# Altium PCB A313_5.PcbDoc (part 4 of 4)
Units mm, origin at the board's own origin, x right, y up, seen from the top; angles counter-clockwise.
Board outline 230.01 x 157.01 mm, 2 copper layers (Top Layer, Bottom Layer); 173 components, 153 nets, 1229 pads, 884 vias.
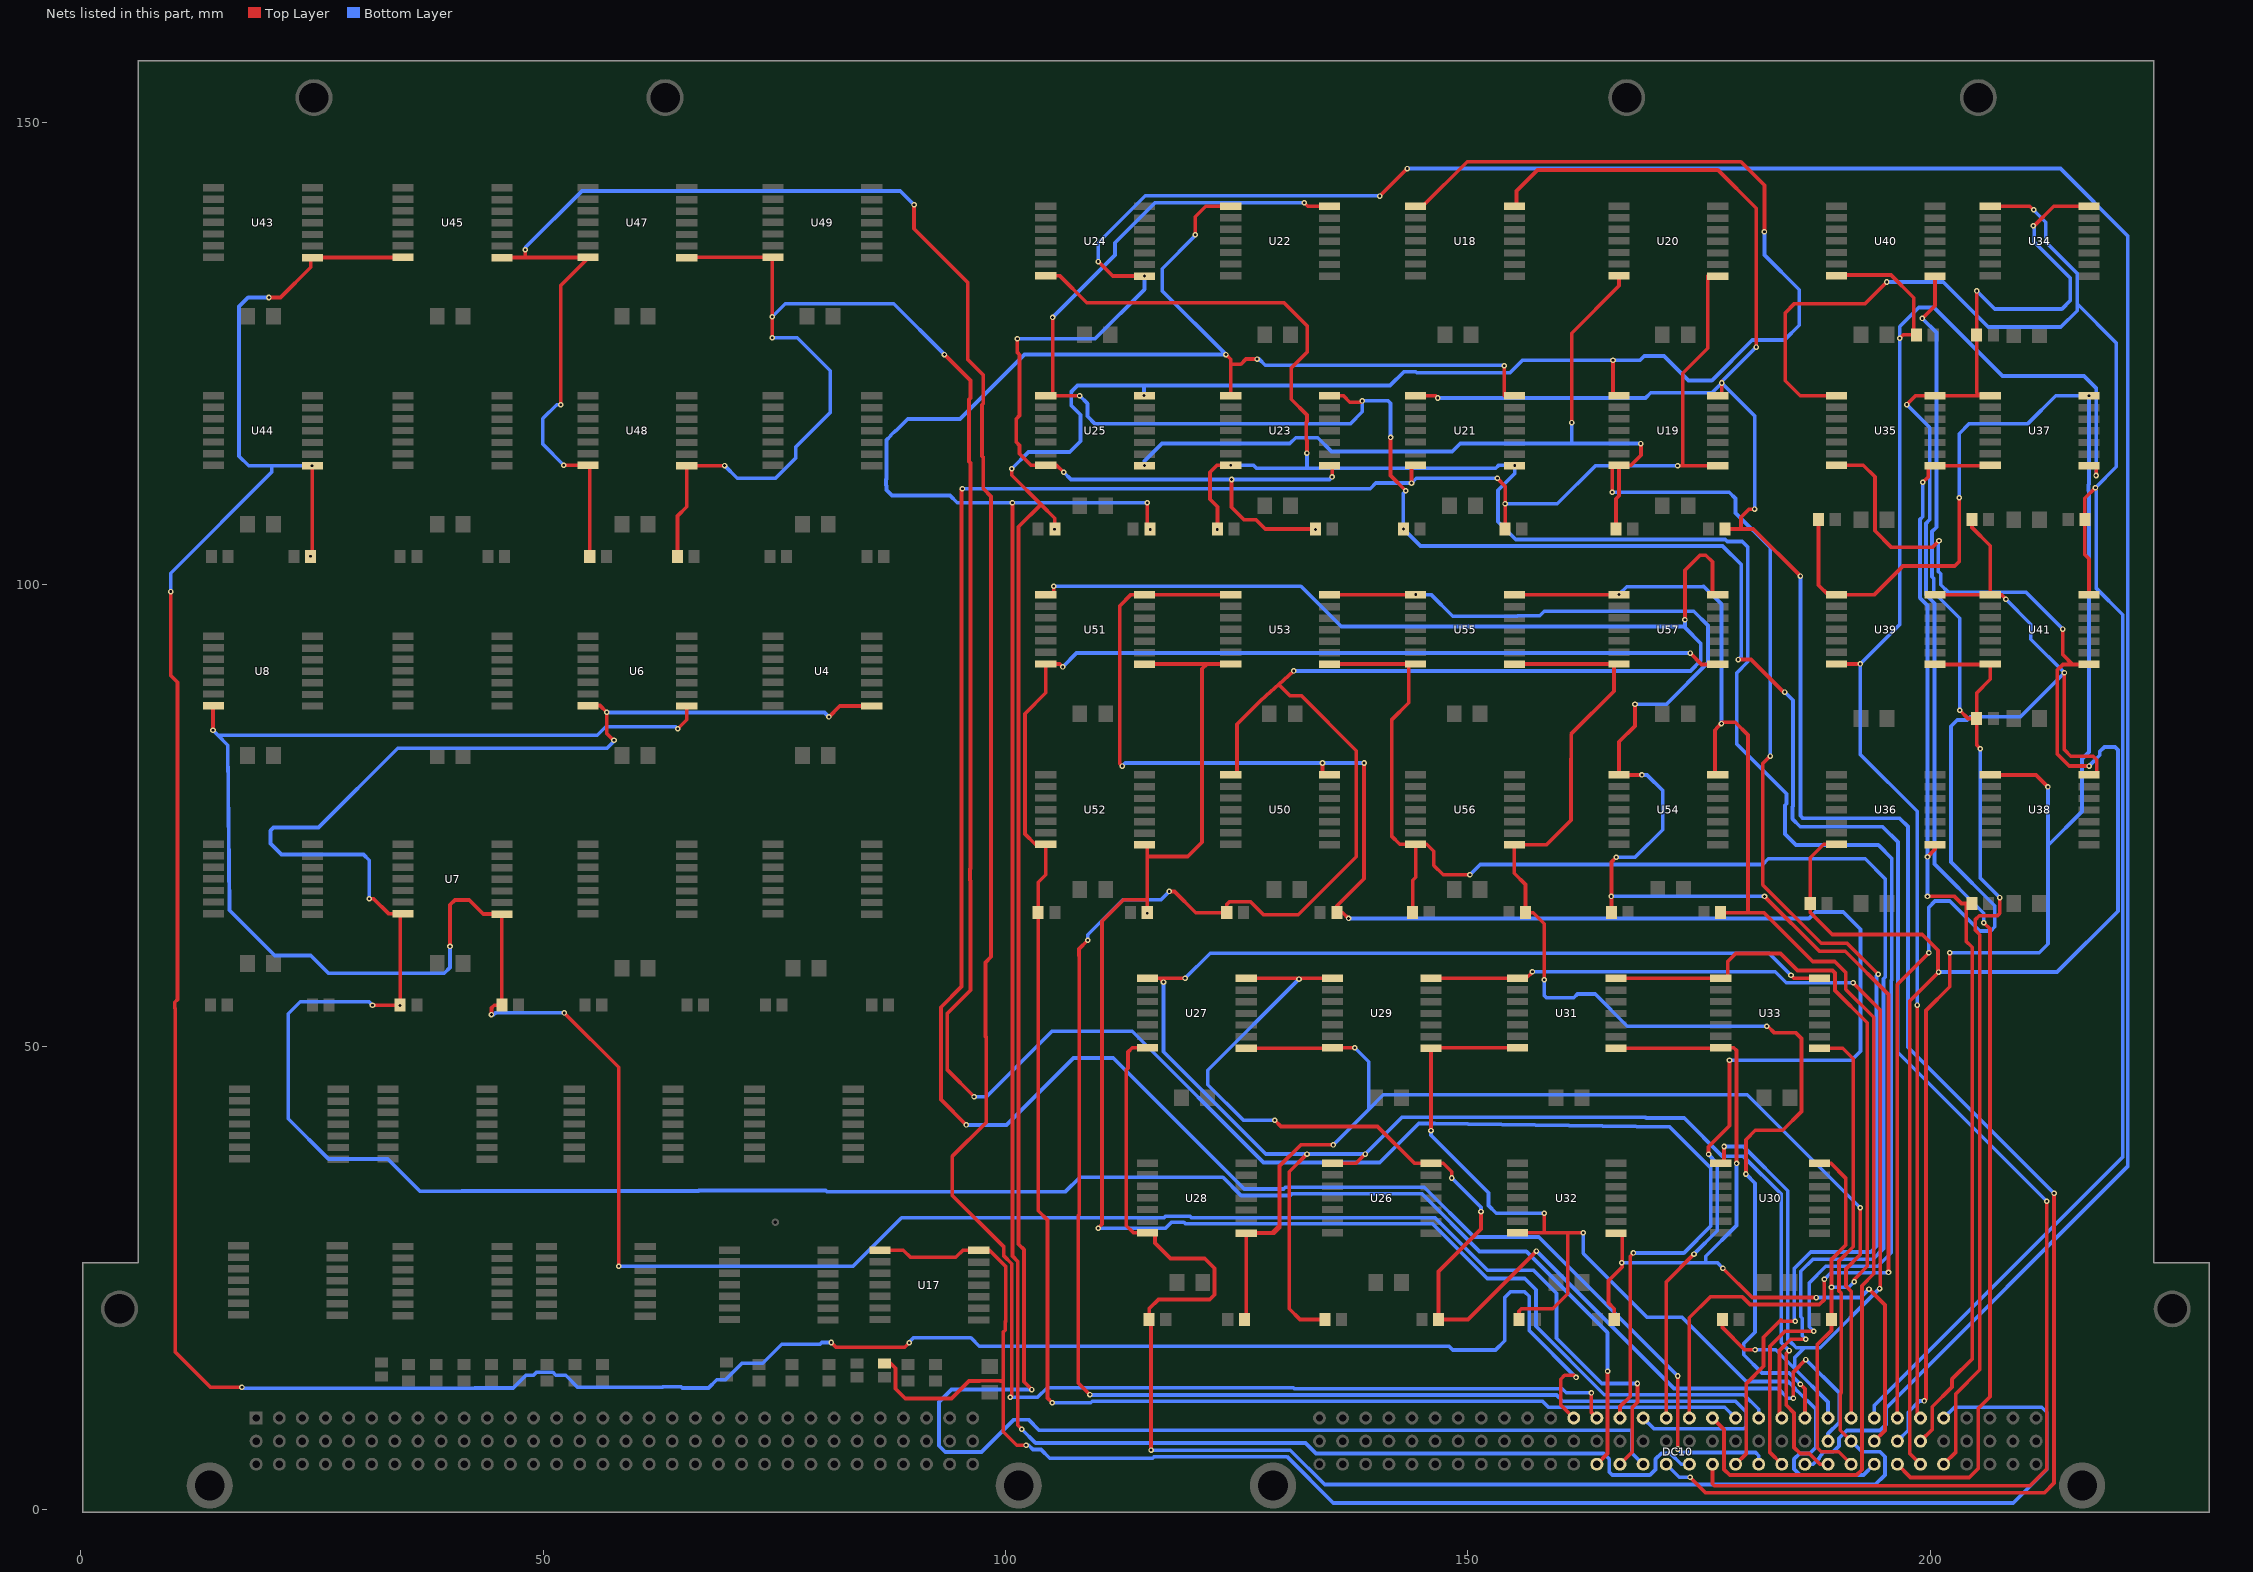
[diagram p4: the nets of this part, all layers, seen from the top]

## Via types
v1: diameter 0.6, hole 0.3, Top Layer to Bottom Layer, 884 vias

## Nets (pads, with @x,y where several pads share a name; then routed paths per layer and width w, separated by ;. In a path a pad name is that pad's centre, name@x,y a point inside that pad or via, vN(x,y) a via of type N, cw(c..) or ccw(c..) an arc to the next point about the centre after c; other vN are vias at no path point) (continued)
vih.6b=: DC10.C12 R45.1 U43.8 U44.8 U45.7 | length 331.8
  Top Layer w0.4: v1(9.712,99.232) 9.712,90.138 10.44,89.41 10.44,55.103 10.152,54.815 10.152,54.19 10.206,54.136 10.206,16.979 14.008,13.176 v1(17.408,13.176) ; v1(20.329,131.032) 21.582,131.032 24.85,134.3 24.85,135.35 34.8,135.35 U45.7@34.85,135.4 ; R45.1@24.825,103 25.025,103.2 U44.8@25.025,112.85 v1(25,112.825) ; v1(81.137,18.013) 81.658,17.493 89.091,17.493 v1(89.575,17.977) ; DC10.C12@161.45,9.85 160.037,11.263 160.037,14.04 160.461,14.464 161.485,14.464 v1(161.705,14.243)
  Bottom Layer w0.4: v1(9.712,99.232) 9.712,101.212 20.646,112.146 20.646,112.804 20.625,112.825 ; v1(17.408,13.176) 17.513,13.071 42.569,13.071 42.602,13.104 46.752,13.104 48.124,14.476 48.935,14.476 49.256,14.797 51.041,14.797 51.362,14.476 52.422,14.476 53.736,13.162 62.861,13.162 62.932,13.233 64.895,13.233 65.042,13.086 65.084,13.086 65.102,13.104 67.879,13.104 68.756,13.981 69.706,13.981 71.491,15.766 73.74,15.766 75.789,17.815 79.942,17.815 80.14,18.013 v1(81.137,18.013) ; v1(20.329,131.032) 18.082,131.032 17.1,130.05 17.1,113.865 18.14,112.825 20.625,112.825 ; v1(25,112.825) 20.625,112.825 ; v1(89.575,17.977) 89.575,18.056 90.047,18.528 96.247,18.528 97.154,17.621 147.946,17.621 148.352,17.215 152.993,17.215 153.975,18.197 153.975,22.875 154.614,23.514 156.121,23.514 156.626,23.009 156.626,19.322 v1(161.705,14.243)
  other v1: 24.822,103.05
vih.7a=: DC10.A13 R7.1 U4.8 U6.7 U7.7 | length 300.3
  Top Layer w0.4: v1(31.175,66.008) 31.649,66.008 33.258,64.4 U7.7@34.85,64.4 34.525,64.075 R7.1@34.525,54.5 v1(31.533,54.5) ; U6.7@54.848,86.9 56.143,86.9 v1(56.867,86.176) 56.867,83.877 57.594,83.15 v1(57.65,83.15) ; v1(80.891,85.668) 82.073,86.85 U4.8@85.525,86.85 ; DC10.A13@163.95,4.85 165.109,6.009 v1(165.109,14.897)
  Bottom Layer w0.4: v1(31.175,66.008) 31.175,70.174 30.565,70.784 21.701,70.784 20.507,71.977 20.507,73.374 20.837,73.705 25.688,73.705 34.276,82.292 56.9,82.292 57.65,83.042 v1(57.65,83.15) ; v1(31.533,54.5) 31.169,54.864 23.713,54.864 22.429,53.58 22.429,42.225 26.789,37.865 33.181,37.865 36.661,34.385 41.158,34.385 41.172,34.4 66.8,34.4 66.854,34.454 80.533,34.454 80.652,34.335 106.486,34.335 108.035,35.884 123.504,35.884 125.474,33.914 130.792,33.914 130.995,34.117 144.998,34.117 151.248,27.866 156.326,27.866 165.109,19.084 v1(165.109,14.897) ; v1(56.867,86.176) 56.897,86.146 80.413,86.146 v1(80.891,85.668)
  other v1: 34.5,54.475
vih.7b=: DC10.C13 R47.1 U45.8 U47.7 U48.7 | length 297.7
  Top Layer w0.4: U45.8@45.525,135.35 47.925,135.35 ; v1(48.05,136.2) 48.05,135.475 47.925,135.35 ; v1(51.901,119.445) 51.901,132.325 54.85,135.274 U47.7@54.85,135.4 54.8,135.35 47.925,135.35 ; v1(52.228,112.9) U48.7@54.85,112.9 55.025,112.9 R47.1@55.025,103 ; v1(90.103,141.065) 90.103,138.459 95.9,132.661 95.9,124.332 97.599,122.633 97.599,119.579 97.453,119.433 97.453,113.867 97.599,113.721 97.599,110.354 98.434,109.519 98.434,59.735 97.824,59.125 97.824,51.099 97.926,50.997 97.926,41.828 94.218,38.119 94.218,33.945 99.816,28.347 99.816,27.375 100.659,26.532 100.659,12.226 v1(100.517,12.084) ; v1(163.356,12.569) 163.356,10.444 DC10.C13@163.95,9.85
  Bottom Layer w0.4: v1(48.05,136.2) 48.05,136.427 54.18,142.557 81.602,142.557 81.608,142.55 88.618,142.55 v1(90.103,141.065) ; v1(51.901,119.445) 51.46,119.445 49.948,117.934 49.948,115.18 v1(52.228,112.9) ; v1(100.517,12.084) 103.463,12.084 104.511,13.132 131.128,13.132 131.234,13.026 160.173,13.026 160.631,12.569 v1(163.356,12.569)
vih.8a=: DC10.A14 R8.1 U6.8 U7.8 U8.7 | length 298
  Top Layer w0.4: v1(14.284,84.22) 14.284,86.9 U8.7@14.35,86.9 ; v1(39.912,60.852) 39.912,65.348 40.446,65.881 41.988,65.881 43.519,64.35 U7.8@45.525,64.35 R8.1@45.525,54.5 44.7,54.5 44.4,54.2 v1(44.4,53.475) ; v1(52.282,53.664) 58.175,47.771 v1(58.175,26.257) ; v1(64.536,84.384) 65.516,85.363 65.516,86.85 U6.8@65.525,86.85 ; DC10.A14@166.45,4.85 167.776,6.176 167.776,10.992 168.335,11.551 v1(168.335,13.583)
  Bottom Layer w0.4: v1(14.284,84.22) 14.812,83.692 ; v1(39.912,60.852) 39.912,58.577 39.285,57.95 26.775,57.95 24.852,59.873 20.952,59.873 16.067,64.758 15.884,82.62 14.812,83.692 ; v1(44.4,53.475) 44.651,53.475 44.84,53.664 v1(52.282,53.664) ; v1(58.175,26.257) 83.499,26.257 88.757,31.515 117.128,31.515 117.282,31.669 119.944,31.669 120.098,31.515 146.44,31.515 152.124,25.831 157.096,25.831 159.58,23.348 159.58,18.477 164.474,13.583 v1(168.335,13.583) ; v1(64.536,84.384) 64.316,84.604 56.747,84.604 55.835,83.692 14.812,83.692
vih.8b=: DC10.C14 R48.1 U47.8 U48.8 U49.7 | length 292
  Top Layer w0.4: R48.1@64.525,103 64.525,107.41 65.525,108.41 U48.8@65.525,112.85 v1(69.605,112.85) ; U47.8@65.525,135.35 65.575,135.4 U49.7@74.85,135.4 74.775,135.325 v1(74.775,128.95) v1(74.775,126.675) ; v1(93.392,124.86) 96.199,122.053 96.199,120.159 96.053,120.013 96.053,113.287 96.199,113.141 96.199,69.28 96.146,69.227 96.146,68.023 96.199,67.97 96.199,56.102 93.708,53.611 93.708,47.492 v1(96.6,44.6) ; DC10.C14@166.45,9.85 166.45,11.085 167.547,12.182 167.547,27.349 v1(167.904,27.705)
  Bottom Layer w0.4: v1(69.605,112.85) 70.981,111.474 75.124,111.474 77.312,113.662 77.312,114.863 81.05,118.6 81.05,123.104 77.479,126.675 v1(74.775,126.675) ; v1(74.775,128.95) 76.183,130.358 87.894,130.358 v1(93.392,124.86) ; v1(96.6,44.6) 97.93,44.6 105.016,51.687 113.693,51.687 127.887,37.492 140.479,37.492 144.679,41.693 146.389,41.693 171.84,41.32 176.273,36.886 176.273,30.619 173.36,27.705 v1(167.904,27.705)
vih.9a=: DC10.A15 R9.2 U18.1 U19.1 U25.14 | length 364
  Top Layer w0.4: v1(100.669,112.516) 100.669,111.812 103.823,108.659 ; v1(102.828,12.922) 101.99,13.761 101.99,28.061 101.406,28.645 101.406,106.242 103.823,108.659 ; R9.2@105.325,106 105.325,107.156 103.823,108.659 ; U18.1@144.35,140.9 145.094,140.9 149.92,145.726 179.524,145.726 182.075,143.175 v1(182.075,138.15) ; v1(165.693,124.251) 165.693,120.4 U19.1@166.35,120.4
  Bottom Layer w0.4: v1(100.669,112.516) 102.479,114.326 106.943,114.326 108.111,115.494 108.111,118.358 107.089,119.38 107.089,120.815 107.135,120.861 ; v1(102.828,12.922) 94.141,12.922 92.795,11.576 92.795,6.852 93.481,6.166 97.404,6.166 100.913,9.675 102.478,9.675 103.6,8.554 167.751,8.528 167.751,6.049 DC10.A15@168.95,4.85 ; 107.135,120.815 107.135,120.861 ; v1(114.975,120.425) 114.975,121.457 114.925,121.507 ; v1(182.075,138.15) 182.075,135.631 185.835,131.871 185.835,128.035 184.227,126.427 180.747,126.427 176.387,122.066 173.847,122.066 171.205,124.708 169.071,124.708 168.614,124.251 v1(165.693,124.251) 155.898,124.251 154.546,122.898 144.457,122.898 144.357,122.998 143.079,122.998 141.589,121.507 114.925,121.507 ; 107.135,120.861 107.781,121.507 114.925,121.507
  other v1: 105.3,105.975
vih.9b=: DC10.C15 R25.2 U50.1 U51.1 U57.14 | length 344.3
  Top Layer w0.4: U51.1@104.35,98.9 105.216,98.9 v1(105.216,99.816) ; v1(108.899,61.513) 107.948,60.562 107.948,59.846 107.965,59.829 107.965,31.868 107.862,31.765 107.862,13.635 v1(109.12,12.377) ; v1(117.7,66.8) 118.275,66.8 120.575,64.5 R25.2@123.925,64.5 123.925,65.388 124.215,65.678 126.501,65.678 127.904,64.275 131.651,64.275 137.937,70.561 137.937,82.004 131.966,87.975 130.736,87.975 129.534,89.176 ; U50.1@124.35,79.4 125.028,79.4 125.028,84.881 127.51,87.363 128.193,87.975 129.534,89.176 ; v1(131.175,90.646) 129.534,89.176 ; v1(173.475,96.175) 173.475,101.527 175.109,103.161 175.734,103.161 176.451,102.443 176.451,98.9 U57.14@177.025,98.9
  Bottom Layer w0.4: v1(105.216,99.816) 131.937,99.816 136.305,95.448 173.363,95.448 173.53,95.281 ; v1@108.892,61.519 108.892,62.109 112.683,65.9 116.8,65.9 v1(117.7,66.8) ; v1(109.12,12.377) 109.168,12.329 159.596,12.329 160.258,11.667 178.938,11.667 180.12,10.484 180.12,8.96 179.841,8.681 170.119,8.681 DC10.C15@168.95,9.85 ; v1(131.175,90.646) 174.075,90.646 175.193,91.764 175.193,93.618 173.531,95.281 ; v1(173.475,96.175) 173.475,95.336 173.531,95.281
vih.10a=: DC10.A16 R10.2 U18.14 U19.14 U21.1 | length 274.3
  Top Layer w0.4: U21.1@144.35,120.4 146.506,120.4 v1(146.745,120.161) ; U18.14@155.025,140.9 155.254,140.9 155.254,142.564 157.514,144.825 177.036,144.825 181.187,140.674 v1(181.187,125.673) ; v1(174.024,3.448) 175.701,1.772 212.353,1.772 213.394,2.813 v1(213.394,34.157) ; U19.14@177.025,120.4 177.453,120.4 v1(177.453,121.787) v1@177.453,121.939 ; R10.2@177.825,106 179.544,106 ; v1(181.009,108.147) 180.422,108.147 179.544,107.269 179.544,106 ; v1(185.962,100.908) 180.87,106 179.544,106
  Bottom Layer w0.4: v1(146.745,120.161) 169.215,120.161 169.778,120.725 176.392,120.725 v1(177.453,121.787) 181.009,118.231 v1(181.009,108.147) ; DC10.A16@171.45,4.85 172.852,3.448 v1(174.024,3.448) ; v1@177.453,121.939 v1(181.187,125.673) ; v1(185.962,100.908) 185.962,74.988 186.25,74.7 196.71,74.7 197.594,73.817 197.594,49.957 v1(213.394,34.157)
vih.10b=: DC10.C16 R26.2 U50.14 U51.14 U53.1 | length 203.7
  Top Layer w0.4: v1(112.607,80.359) 112.35,80.617 112.35,97.679 113.571,98.9 U51.14@115.025,98.9 U53.1@124.35,98.9 ; v1(134.273,80.69) 134.273,79.4 U50.14@135.025,79.4 ; v1(137.093,63.875) 136.468,64.5 R26.2@135.825,64.5 135.825,65.221 138.769,68.165 v1(138.769,80.69) ; DC10.C16@171.45,9.85 171.45,24.572 v1(174.453,27.575) ; v1(176.032,38.37) 176.032,39.196 176.031,39.197 178.292,41.458 v1(178.292,48.533)
  Bottom Layer w0.4: v1(112.607,80.359) 112.937,80.69 v1(134.273,80.69) v1(138.769,80.69) ; v1(137.093,63.875) 186.877,63.875 187.572,64.57 190.595,64.57 192.457,62.709 192.457,49.507 191.483,48.533 v1(178.292,48.533) ; v1(174.453,27.575) 176.973,30.095 176.973,37.406 176.032,38.347 v1(176.032,38.37)
vih.11a=: DC10.A17 R11.2 U21.14 U22.1 U23.1 | length 318.1
  Top Layer w0.4: v1(100.745,108.833) 100.745,27.371 101.33,26.786 101.33,9.062 v1(101.754,8.638) ; R11.2@115.325,106 v1(115.325,108.833) ; v1(120.525,137.825) 120.525,139.775 121.65,140.9 U22.1@124.35,140.9 ; v1(123.834,124.86) 124.342,124.352 124.342,123.825 ; U23.1@124.35,120.4 124.342,120.4 124.342,123.825 ; v1(127.2,124.375) 126,124.375 125.45,123.825 124.342,123.825 ; v1(153.933,123.652) 153.933,120.4 U21.14@155.025,120.4
  Bottom Layer w0.4: v1(101.754,8.638) 103.248,7.143 132.447,7.143 133.576,6.014 164.677,6.014 165.287,5.404 165.287,4.007 165.617,3.677 169.681,3.677 170.291,4.286 170.291,5.404 170.9,6.014 171.918,6.014 173.082,4.85 DC10.A17@173.95,4.85 ; v1(115.325,108.833) v1(100.745,108.833) 94.776,108.833 93.989,109.62 87.715,109.62 87.129,110.206 87.129,110.664 87.063,110.73 87.063,111.355 87.117,111.409 87.117,111.637 87.129,111.649 87.129,115.613 87.588,116.072 87.588,116.136 88.057,116.605 88.121,116.605 89.417,117.901 95.081,117.901 102.041,124.86 v1(123.834,124.86) 116.951,131.744 116.951,134.154 120.525,137.729 v1(120.525,137.825) ; v1(127.2,124.375) 127.398,124.375 128.075,123.698 153.887,123.698 v1(153.933,123.652)
  other v1: 115.65,105.938
vih.11b=: DC10.C17 R27.2 U53.14 U54.1 U55.1 | length 187.9
  Top Layer w0.4: U53.14@135.025,98.9 v1(144.35,98.9) ; v1(165.515,66.262) v1@165.525,66.253 ; R27.2@165.525,64.5 v1@165.525,66.253 ; v1(166.033,70.488) 165.525,69.98 v1@165.525,66.253 ; v1(168.075,87.05) 168.075,84.7 166.35,82.975 U54.1@166.35,79.4 v1(168.825,79.4) ; DC10.C17@173.95,9.85 173.95,20.689 176.211,22.95 179.685,22.95 180.518,22.117 187.994,22.117 188.553,22.676 v1(188.553,24.86) ; v1(182.076,66.262) 188.014,60.325 190.808,60.325 195.487,55.645 v1(195.487,25.597)
  Bottom Layer w0.4: v1(144.35,98.9) 146.01,98.9 148.36,96.55 155.325,96.55 155.388,96.613 157.763,96.613 158.259,97.109 166.899,97.109 166.907,97.101 174.424,97.101 175.976,95.549 175.976,91.557 171.469,87.05 v1(168.075,87.05) ; v1(165.515,66.262) v1(182.076,66.262) ; v1(166.033,70.488) 168.076,70.488 171.064,73.476 171.064,77.711 169.375,79.4 v1(168.825,79.4) ; v1(188.553,24.86) 189.25,25.557 195.448,25.557 v1(195.487,25.597)
vih.12a=: DC10.A18 R12.2 U22.14 U23.14 U25.1 | length 299.1
  Top Layer w0.4: U25.1@104.35,120.4 U25.1@105.089,120.4 ; v1(105.089,128.873) U25.1@105.089,120.4 ; v1(108.01,120.4) U25.1@105.089,120.4 ; v1(132.305,141.269) 132.673,140.9 U22.14@135.025,140.9 ; U23.14@135.025,120.4 136.544,120.4 137.23,119.714 137.22,119.704 138.429,119.704 v1(138.575,119.85) ; v1(141.639,115.894) 141.639,111.779 v1(143.29,110.128) ; DC10.A18@176.45,4.85 176.45,2.737 176.653,2.534 210.804,2.534 212.607,4.337 v1(212.607,33.293) ; v1(179.25,91.875) 180.612,91.875 184.127,88.36 v1(184.261,88.36)
  Bottom Layer w0.4: v1(105.089,128.873) 111.845,135.63 111.845,136.945 116.169,141.269 v1(132.305,141.269) ; v1(108.01,120.4) 108.853,119.557 108.853,118.18 109.668,117.365 137.268,117.365 138.575,118.672 v1(138.575,119.85) 141.375,119.85 141.639,119.586 v1(141.639,115.894) ; v1(143.29,110.128) 143.025,109.863 v1(143.025,106) 144.866,104.159 177.547,104.159 179.579,102.127 179.579,92.204 v1(179.25,91.875) ; v1(184.261,88.36) 185.156,87.465 185.156,76.004 185.1,75.949 185.1,74.643 185.937,73.806 194.852,73.806 196.524,72.135 196.524,56.937 196.5,56.914 196.5,49.4 v1(212.607,33.293)
vih.12b=: DC10.C18 R28.2 U54.14 U55.14 U57.1 | length 158.8
  Top Layer w0.4: U55.14@155.025,98.9 v1(166.35,98.9) ; DC10.C18@176.45,9.85 177.707,8.593 177.707,4.286 178.317,3.677 192.033,3.677 192.617,4.261 192.617,24.165 193.893,25.441 193.893,53.185 190.875,56.204 190.875,58.034 189.682,59.227 187.291,59.227 182.018,64.5 180.232,64.5 ; U54.14@177.025,79.4 176.869,79.4 176.717,79.552 176.717,84.246 177.356,85.006 v1@177.422,85.084 ; R28.2@177.325,64.5 180.232,64.5 ; v1(177.422,84.95) v1@177.422,85.084 ; v1@177.422,85.084 178.927,85.084 180.3,83.71 180.3,64.568 180.232,64.5
  Bottom Layer w0.4: v1(166.35,98.9) 167.19,99.74 175.402,99.74 175.479,99.816 177.422,97.873 v1(177.422,84.95)
vih.13a=: DC10.A19 R14.1 U19.7 U20.7 U25.8 | length 229.5
  Top Layer w0.4: v1(161.234,117.5) 161.234,127.175 166.35,132.291 U20.7@166.35,133.4 ; v1(165.617,109.976) 165.617,112.9 U19.7@166.35,112.9 ; R14.1@166.025,106 166.025,109.265 166.35,109.59 U19.7@166.35,112.9 ; v1(168.69,115.234) 168.716,115.208 168.716,113.967 167.649,112.9 U19.7@166.35,112.9 ; DC10.A19@178.95,4.85 180.12,6.02 180.12,13.583 181.975,15.437 181.975,18.592 183.849,20.466 183.99,20.325 v1(185.4,20.325) ; v1(182.711,81.437) 181.898,80.624 181.898,67.507 188.205,61.2 190.999,61.2 v1(194.37,57.83)
  Bottom Layer w0.4: v1(115.025,112.85) 115.025,113.342 116.916,115.234 130.732,115.234 131.373,115.875 133.756,115.875 135.253,114.378 148.307,114.378 149.162,115.234 161.319,115.234 ; v1@161.319,117.5 v1(161.234,117.5) 161.234,115.318 161.319,115.234 ; v1(165.617,109.976) 178.26,109.976 178.938,109.298 178.938,107.73 182.711,103.957 v1(182.711,81.437) ; v1(168.69,115.234) 161.319,115.234 ; v1(185.4,20.325) 185.3,20.425 185.3,26.008 187.088,27.796 193.557,27.796 194.2,28.439 194.2,57.66 v1(194.37,57.83)
vih.13b=: DC10.C19 R30.1 U51.7 U52.7 U57.8 | length 232.1
  Top Layer w0.4: U51.7@104.35,91.4 U51.7@104.352,91.4 ; v1(105.038,11.5) 104.53,12.008 104.53,31.261 103.525,32.266 103.525,67.786 104.35,68.611 U52.7@104.35,71.9 103.211,71.9 102.092,73.02 102.092,86.021 104.352,88.281 U51.7@104.352,91.4 ; v1(106.181,91.078) 105.859,91.4 U51.7@104.352,91.4 ; v1(174.042,92.577) 175.269,91.35 U57.8@177.025,91.35
  Bottom Layer w0.4: v1(105.038,11.5) 109.218,11.5 109.376,11.658 158.068,11.658 158.713,11.013 177.787,11.013 DC10.C19@178.95,9.85 ; v1(106.181,91.078) 107.68,92.577 v1(174.042,92.577)
vih.14a=: DC10.A20 R13.1 U19.8 U20.8 U21.7 | length 297.1
  Top Layer w0.4: v1(95.335,110.357) 95.234,110.255 95.234,56.509 93.008,54.283 93.008,44.282 v1(95.742,41.548) ; v1(143.9,110.966) 143.9,112.9 U21.7@144.35,112.9 ; v1(153.19,111.474) 153.19,111.455 154.025,110.62 v1(154.025,108.731) R13.1@154.025,106 ; v1(172.678,112.846) 172.682,112.85 173.325,112.85 ; v1(172.704,6.496) v1(172.704,14.39) ; U19.8@177.025,112.85 173.325,112.85 ; U20.8@177.025,133.35 175.929,133.35 175.929,125.538 173.225,122.833 173.225,112.95 173.325,112.85
  Bottom Layer w0.4: v1(95.335,110.357) 139.43,110.357 140.039,110.966 v1(143.9,110.966) 144.408,111.474 v1(153.19,111.474) ; v1(95.742,41.548) 100.11,41.548 107.337,48.775 111.654,48.775 125.815,34.614 130.057,34.614 130.26,34.817 145.288,34.817 150.672,29.432 157.662,29.432 v1(172.704,14.39) ; v1(154.025,108.731) 159.673,108.731 163.788,112.846 v1(172.678,112.846) ; v1(172.704,6.496) 173.085,6.115 181.111,6.115 181.45,5.776 DC10.A20@181.45,4.85
vih.14b=: DC10.C20 R29.1 U51.8 U52.8 U53.7 | length 165.9
  Top Layer w0.4: v1(110.016,30.372) 110.439,30.795 110.439,63.586 112.76,65.907 115.263,65.907 115.32,65.85 ; U52.8@115.025,71.85 U52.8@115.195,71.68 ; U51.8@115.025,91.35 115.075,91.4 121.777,91.4 ; v1(115.32,64.441) 115.32,65.85 ; U52.8@115.32,71.68 115.32,71.806 U52.8@115.194,71.68 ; U53.7@124.35,91.4 121.777,91.4 ; U52.8@115.195,71.68 115.32,71.555 115.32,70.475 ; 115.32,65.85 115.32,70.475 ; 115.32,70.475 115.42,70.575 119.714,70.575 121.25,72.111 121.25,90.873 121.777,91.4
  Bottom Layer w0.4: v1(110.016,30.372) 117.293,30.372 117.936,31.015 119.284,31.015 119.444,30.855 146.175,30.855 152.104,24.927 156.154,24.927 157.37,23.711 157.37,19.762 164.755,12.376 179.86,12.376 181.45,10.786 DC10.C20@181.45,9.85
vih.15a=: DC10.A21 R15.1 U21.8 U23.7 U24.7 | length 246.2
  Top Layer w0.4: U24.7@104.35,133.4 105.845,133.4 108.783,130.462 130.113,130.462 132.625,127.95 132.625,125.13 130.894,123.4 130.894,120.031 132.591,118.334 132.591,117.623 132.528,117.561 132.528,115.639 132.591,115.577 v1(132.591,114.21) ; R15.1@122.925,106 122.925,108.4 122.1,109.225 122.1,112.125 122.875,112.9 v1(124.35,112.9) ; DC10.A21@183.95,5.029 DC10.A21@183.95,4.85 182.63,6.17 182.63,15.103 182.675,15.147 182.675,17.61 184.286,19.222 v1(187.41,19.222)
  Bottom Layer w0.4: v1(124.35,112.9) 126.806,112.9 127.131,112.575 132.55,112.575 ; v1(132.591,114.21) 132.591,112.616 132.55,112.575 ; v1(187.41,19.222) 186.91,19.722 186.91,24.462 188.706,26.257 194.319,26.257 195.792,27.731 195.792,57.196 195.824,57.227 195.824,70.396 194.395,71.825 185.48,71.825 184.286,73.019 184.286,76.124 184.456,76.294 184.456,77.37 179.079,82.747 179.079,90.432 180.279,91.632 180.279,104.053 179.682,104.65 178.046,104.65 177.837,104.859 155.163,104.859 153.247,106.775 153.247,110.179 155.076,112.008 v1(155.076,112.875) 153.3,112.875 153,112.575 132.55,112.575
  other v1: 122.904,105.95
vih.15b=: DC10.C21 R31.1 U53.8 U55.7 U56.7 | length 162.3
  Top Layer w0.4: U53.8@135.025,91.35 135.075,91.4 U55.7@143.595,91.4 ; R31.1@144.025,64.5 144.025,68.015 144.35,68.34 U56.7@144.35,71.9 ; U55.7@144.35,91.4 U55.7@143.595,91.4 ; v1(150.225,68.599) 147.329,68.599 146.313,69.615 146.313,71.139 145.552,71.9 U56.7@144.35,71.9 ; DC10.C21@183.95,9.85 183.613,10.188 183.696,10.271 183.696,17.149 184.905,18.358 v1(186.547,18.358) ; U55.7@143.595,91.4 143.595,87.192 141.75,85.347 141.75,72.781 142.631,71.9 U56.7@144.35,71.9
  Bottom Layer w0.4: v1(150.225,68.599) 151.342,69.717 181.889,69.717 182.494,70.321 192.978,70.321 195.124,68.175 195.124,57.517 194.95,57.343 194.95,28.167 193.811,27.028 187.311,27.028 186,25.718 186,20.791 186.154,20.637 186.154,18.751 v1(186.547,18.358)
vih.16a=: DC10.A22 R16.1 U23.8 U24.8 U25.7 | length 355.7
  Top Layer w0.4: v1(101.279,126.562) 101.279,125.077 101.515,124.841 101.515,118.263 101.153,117.901 101.153,115.399 101.515,115.037 101.515,114.122 102.737,112.9 U25.7@104.35,112.9 105.517,112.9 v1(106.283,112.135) ; v1(110.016,134.919) 111.585,133.35 v1(115.025,133.35) ; v1(124.444,111.347) 124.444,108.35 125.79,107.004 127.085,107.004 128.089,106 R16.1@133.525,106 ; U23.8@135.025,112.85 135.315,112.85 v1(135.315,111.627) ; v1(140.471,142.005) v1(143.443,144.977)
  Bottom Layer w0.4: v1(101.279,126.562) 109.676,126.562 115.025,131.911 v1(115.025,133.35) ; v1(106.283,112.135) 107.07,111.347 v1(124.444,111.347) 135.035,111.347 v1(135.315,111.627) ; v1(110.016,134.919) 110.016,136.941 115.106,142.031 140.446,142.031 v1(140.471,142.005) ; v1(143.443,144.977) 214.08,144.977 221.35,137.707 221.35,37.058 195.208,10.916 195.208,9.139 194.573,8.504 190.972,8.504 190.128,7.66 190.128,6.826 189.493,6.191 188.477,6.191 187.963,5.48 187.334,4.85 DC10.A22@186.45,4.85
  other v1: 133.525,105.95
vih.16b=: DC10.C22 R32.1 U55.8 U56.8 U57.7 | length 136.3
  Top Layer w0.4: U55.8@155.025,91.35 155.075,91.4 U57.7@165.8,91.4 ; v1(158.251,57.245) 158.251,63.316 157.067,64.5 R32.1@156.225,64.5 156.225,67.558 155.025,68.758 U56.8@155.025,71.85 158.505,71.85 161.159,74.504 161.159,81.123 161.163,81.126 161.163,83.813 165.8,88.45 U57.7@165.8,91.4 ; U57.7@166.35,91.4 U57.7@165.8,91.4 ; v1(180.07,36.24) 180.07,39.948 181.086,40.964 184.057,40.964 186.089,42.996 186.089,50.895 185.485,51.5 183.148,51.5 182.427,52.221 v1(182.332,52.221) ; v1(185.962,13.507) 186.45,13.019 DC10.C22@186.45,9.85
  Bottom Layer w0.4: v1(158.251,57.245) 158.251,55.544 158.505,55.29 161.451,55.29 161.858,55.696 163.763,55.696 167.238,52.221 v1(182.332,52.221) ; v1(180.07,36.24) 181.06,35.249 181.06,19.12 179.841,17.901 179.841,16.682 181.815,14.708 184.761,14.708 v1(185.962,13.507)
vih.17a=: DC10.A23 R17.2 U26.1 U27.1 U33.14 | length 218
  Top Layer w0.4: U27.1@115.35,57.4 116.669,57.4 ; v1(117.078,56.991) 116.669,57.4 ; v1(119.414,57.4) 116.669,57.4 ; v1(132.597,38.399) 130.692,36.494 130.692,21.66 131.852,20.5 R17.2@134.525,20.5 ; U26.1@135.35,37.4 137.898,37.4 v1(138.896,38.399) ; v1(184.758,17.144) 184.446,16.833 184.446,11.224 185.277,10.394 185.277,6.664 185.937,6.004 186.928,6.004 188.082,4.85 DC10.A23@188.95,4.85 ; v1(184.946,57.728) 185.274,57.4 U33.14@188.025,57.4
  Bottom Layer w0.4: v1(117.078,56.991) 117.078,49.448 128.127,38.399 v1(132.597,38.399) v1(138.896,38.399) 142.859,42.361 169.198,42.361 169.275,42.285 173.389,42.285 177.53,38.145 179.816,38.145 183.884,34.077 183.884,17.976 184.716,17.144 v1(184.758,17.144) ; v1(119.414,57.4) 122.13,60.116 182.559,60.116 v1(184.946,57.728)
vih.18a=: DC10.B23 R18.2 U26.14 U27.14 U29.1 | length 138
  Top Layer w0.4: U27.14@126.025,57.4 v1@131.812,57.4 ; v1(129.117,42.048) 129.79,41.375 140.238,41.375 144.213,37.4 U26.14@146.025,37.4 147.329,37.4 148.243,36.486 v1(148.243,35.808) ; v1(131.733,57.322) v1@131.812,57.4 ; U29.1@135.35,57.4 v1@131.812,57.4 ; v1(151.418,32.176) 151.418,30.286 146.825,25.692 R18.2@146.825,20.5 150.004,20.5 v1(157.413,27.908) ; v1(185.2,11.983) 185.2,14.827 v1(186.547,16.174)
  Bottom Layer w0.4: v1(129.117,42.048) 125.727,42.048 121.875,45.9 121.875,47.463 v1(131.733,57.322) ; v1(148.243,35.808) 151.418,32.633 v1(151.418,32.176) ; v1(157.413,27.908) 172.291,13.03 183.543,13.03 184.591,11.983 v1(185.2,11.983) ; v1(186.547,16.174) 190.179,12.541 190.179,9.392 188.95,8.163 DC10.B23@188.95,7.35
vih.19a=: DC10.C23 R19.2 U29.14 U30.1 U31.1 | length 140.9
  Top Layer w0.4: U29.14@146.025,57.4 U31.1@155.35,57.4 156.321,57.4 156.981,58.06 v1(156.981,58.109) ; U30.1@177.35,37.4 177.707,37.4 v1(177.707,39.211) ; R19.2@177.525,20.5 177.525,19.628 179.913,17.24 v1(181.06,17.24) ; v1(191.652,56.915) 194.593,53.974 194.593,23.916 v1(194.522,23.844)
  Bottom Layer w0.4: v1(156.981,58.109) 183.245,58.109 184.438,56.915 v1(191.652,56.915) ; v1(177.707,39.211) 179.816,39.211 184.6,34.427 184.6,18.35 185.052,17.898 185.07,17.898 185.512,17.456 185.512,17.439 186.4,17.439 ; v1(181.06,17.24) 183.295,17.24 185.355,15.18 ; DC10.C23@188.95,9.85 188.95,11.585 185.355,15.18 ; v1(194.522,23.844) 188.116,17.439 186.4,17.439 ; 185.355,15.18 185.355,16.394 186.4,17.439
vih.20a=: DC10.A24 R20.2 U30.14 U31.14 U33.1 | length 103.2
  Top Layer w0.4: U31.14@166.025,57.4 U33.1@177.35,57.4 178.088,57.4 178.088,59.201 178.977,60.09 183.821,60.09 185.658,58.254 189.424,58.254 189.696,57.982 189.696,56.087 193.193,52.59 193.193,26.249 191.779,24.835 v1(191.779,24.581) ; U30.14@188.025,37.4 189.264,37.4 190.85,35.814 190.85,28.53 189.325,27.005 v1(189.325,23.999) R20.2@189.325,20.5 189.325,19.323 187.791,17.789 187.791,6.623 188.223,6.191 190.109,6.191 DC10.A24@191.45,4.85
  Bottom Layer w0.4: v1(189.325,23.999) 191.197,23.999 v1(191.779,24.581)
vih.21a=: DC10.B24 R22.1 U27.7 U28.7 U33.8 | length 193.6
  Top Layer w0.4: U27.7@115.35,49.9 113.699,49.9 113.234,49.435 113.234,47.67 113.055,47.491 113.055,30.646 113.801,29.9 U28.7@115.35,29.9 116.163,29.9 116.163,28.772 117.84,27.096 121.548,27.096 122.589,26.054 122.589,23.184 122.081,22.676 116.541,22.676 115.525,21.66 R22.1@115.525,20.5 115.734,20.291 v1(115.734,6.375) ; U33.8@188.025,49.85 190.541,49.85 191.677,48.713 191.677,28.368 190.145,26.836 190.145,23.593 190.382,23.356 190.382,12.567 190.28,12.465 190.28,8.52 DC10.B24@191.45,7.35
  Bottom Layer w0.4: v1(115.734,6.375) 130.793,6.375 134.514,2.654 194.065,2.654 195.106,3.696 195.106,5.658 194.573,6.191 192.609,6.191 DC10.B24@191.45,7.35
vih.22a=: DC10.C24 R21.1 U27.8 U28.8 U29.7 | length 141.3
  Top Layer w0.4: R21.1@125.825,20.5 126.025,20.7 U28.8@126.025,29.85 128.798,29.85 ; U27.8@126.025,49.85 135.3,49.85 U29.7@135.35,49.9 137.753,49.9 v1(137.758,49.905) ; 129.632,37.128 129.632,37.11 ; v1(135.442,39.389) 131.911,39.389 129.632,37.11 ; DC10.C24@191.45,9.85 191.45,23.537 190.888,24.098 190.888,25.968 192.439,27.519 v1(192.439,32.582) ; 128.798,29.85 129.041,29.85 129.632,30.441 129.632,37.11 ; 128.798,29.85 129.625,30.677 129.625,37.103 129.632,37.11
  Bottom Layer w0.4: v1(135.442,39.389) 139.277,43.225 ; v1(137.758,49.905) 139.277,48.386 139.277,43.225 ; v1(192.439,32.582) 180.222,44.799 140.852,44.799 139.277,43.225
vih.23a=: DC10.A25 R23.1 U29.8 U31.7 U32.7 | length 110
  Top Layer w0.4: v1(146.008,40.939) 146.008,49.85 146.058,49.9 U31.7@155.35,49.9 ; U32.7@155.35,29.9 158.225,29.9 ; R23.1@155.525,20.5 155.525,21.406 155.779,21.66 159.165,21.66 160.791,23.286 160.791,29.859 160.75,29.9 ; v1(158.251,31.998) 158.251,29.926 158.225,29.9 ; v1(162.467,29.89) 162.457,29.9 160.75,29.9 ; 158.225,29.9 160.75,29.9
  Bottom Layer w0.4: v1(146.008,40.939) 146.008,40.431 152.23,34.209 152.23,32.836 153.068,31.998 v1(158.251,31.998) ; v1(162.467,29.89) 162.467,27.654 169.376,20.746 173.161,20.746 180.105,13.801 184.626,13.801 185.208,13.219 185.208,13.194 185.65,12.753 185.675,12.753 187.613,10.814 187.613,6.649 186.978,6.014 185.886,6.014 185.277,5.404 185.277,4.337 185.937,3.677 192.777,3.677 DC10.A25@193.95,4.85
vih.24a=: DC10.B25 R24.1 U31.8 U32.8 U33.7 | length 94.8
  Top Layer w0.4: R24.1@165.825,20.5 165.825,21.66 165.205,22.28 165.205,24.693 166.684,26.172 166.684,29.85 U32.8@166.025,29.85 ; U31.8@166.075,49.9 U31.8@166.025,49.85 177.3,49.85 U33.7@177.35,49.9 178.754,49.9 179.054,49.6 v1(179.054,37.383) ; v1(177.575,26.05) 180.746,22.879 v1(187.664,22.879) ; v1(193.379,23.794) 195.106,22.066 195.106,8.506 DC10.B25@193.95,7.35
  Bottom Layer w0.4: v1(166.642,26.638) 175.725,26.638 ; v1(177.575,26.05) 176.987,26.638 175.725,26.638 ; v1(179.054,37.383) 179.054,30.679 175.725,27.35 175.725,26.638 ; v1(187.664,22.879) 192.465,22.879 v1(193.379,23.794)
vih.25a=: DC10.C25 R33.2 U34.1 U35.1 U41.14 | length 215.9
  Top Layer w0.4: U35.1@189.85,120.4 185.937,120.4 184.311,122.026 184.311,129.356 185.327,130.372 192.973,130.372 v1(195.31,132.709) ; U34.1@206.496,140.9 210.766,140.9 211.141,140.525 v1(211.2,140.525) ; U41.14@217.941,99.012 217.959,98.994 217.865,98.9 U41.14@217.171,98.9 217.171,102.711 217.142,102.74 217.142,102.812 216.725,103.23 R33.2@216.725,107 216.725,109.319 v1(217.865,110.458) 217.959,110.364 v1@217.941,110.346
  Bottom Layer w0.4: DC10.C25@193.95,9.85 193.95,11.203 220.825,38.078 220.825,77.296 220.825,96.729 217.941,99.613 217.941,110.382 v1(217.865,110.458) 220.125,112.719 220.125,126.118 215.89,130.354 215.89,130.51 ; v1(195.31,132.709) 201.414,132.709 206.282,127.84 214.123,127.84 215.89,129.607 215.89,130.51 ; v1(211.2,140.525) 211.2,140.466 212.492,139.174 212.492,137.033 215.89,133.635 215.89,130.51
vih.26a=: DC10.A26 R34.2 U34.14 U35.14 U37.1 | length 178.3
  Top Layer w0.4: DC10.A26@196.45,4.85 197.875,3.425 204.227,3.425 205.19,4.388 205.19,10.89 206.46,12.16 206.46,62.757 v1(205.8,63.418) ; v1(197.469,119.45) 198.419,120.4 U35.14@200.525,120.4 205.345,120.4 ; v1(205.025,131.742) R34.2@205.025,127 205.025,120.72 205.345,120.4 ; U37.1@206.496,120.4 205.345,120.4 ; v1(211.15,138.8) 211.15,138.731 211.175,138.706 213.369,140.9 U34.14@217.171,140.9
  Bottom Layer w0.4: v1(197.469,119.45) 199.958,116.961 199.958,107.015 199.54,106.598 199.54,98.902 200.466,97.977 200.466,69.767 205.8,64.433 v1(205.8,63.418) ; v1(205.025,131.742) 206.972,129.795 214.24,129.795 215.144,130.699 215.144,133.14 211.262,137.022 211.262,138.688 v1(211.15,138.8)
vih.27a=: DC10.B26 R35.2 U37.14 U38.1 U39.1 | length 195.1
  Top Layer w0.4: R35.2@187.925,107 187.925,99.909 188.934,98.9 U39.1@189.85,98.9 193.975,98.9 197.062,101.987 202.65,101.987 203.133,102.47 v1(203.133,109.366) ; v1(199.358,11.694) 199.364,11.694 199.539,11.868 199.539,53.913 202.117,56.491 v1(202.117,60.166) ; U38.1@206.496,79.4 211.433,79.4 v1(212.734,78.099) ; U37.14@216.7,120.275 216.825,120.4 v1(217.171,120.4)
  Bottom Layer w0.4: DC10.B26@196.45,7.35 197.621,8.521 197.621,10.484 198.831,11.694 v1(199.358,11.694) ; v1(202.117,60.166) 211.794,60.166 212.775,61.147 212.734,61.188 v1(212.734,78.099) ; v1(203.133,109.366) 203.133,116.3 204.225,117.393 210.575,117.393 213.582,120.4 v1(217.171,120.4) 217.171,110.831 217.111,110.771 217.111,110.146 217.171,110.086 217.171,102.504 217.18,102.495 217.18,81.877 216.425,81.121 216.425,75.44 212.775,71.79
vih.28a=: DC10.C26 R36.2 U38.14 U39.14 U41.1 | length 146
  Top Layer w0.4: DC10.C26@196.45,9.85 196.45,56.76 v1(199.856,60.166) ; U39.14@200.525,98.9 U41.1@206.496,98.9 ; R36.2@204.525,107 204.525,106.149 206.496,104.178 U41.1@206.496,98.9 ; v1(208.187,98.393) 207.681,98.9 U41.1@206.496,98.9 ; v1(214.512,90.443) 214.512,82.112 215.198,81.426 217.603,81.426 218,81.029 218,79.4 U38.14@217.171,79.4
  Bottom Layer w0.4: v1(199.856,60.166) 199.856,65.094 200.517,65.754 202.121,65.754 205.35,62.525 206.525,62.525 206.975,62.975 206.975,65.24 202.244,69.971 202.244,84.652 202.93,85.338 203.976,85.338 204.339,85.7 209.769,85.7 v1(214.512,90.443) 210.88,94.075 210.88,95.701 v1(208.187,98.393)
vih.29a=: DC10.A27 R38.1 U35.7 U36.7 U41.8 | length 185.8
  Top Layer w0.4: U36.7@189.85,71.9 188.477,71.9 187.025,70.448 187.025,64.515 189.392,62.148 199.145,62.148 200.847,60.446 v1@200.847,58.007 ; U35.7@189.85,112.9 192.77,112.9 194.022,111.647 194.022,105.794 195.809,104.007 200.22,104.007 v1(200.948,104.735) ; DC10.A27@198.95,4.85 197.773,6.027 197.773,54.934 v1@200.847,58.007 ; v1(200.902,58.075) v1@200.847,58.007 ; v1(214.334,95.168) 214.334,92.417 215.401,91.35 ; U41.8@217.171,91.35 215.401,91.35 ; v1(217.179,80.359) 215.045,80.359 213.75,81.655 213.75,90.748 214.352,91.35 215.401,91.35
  Bottom Layer w0.4: v1(200.902,58.075) 213.725,58.075 220.3,64.65 220.3,82.1 219.975,82.425 218.85,82.425 218.347,81.922 218.347,81.528 v1(217.179,80.359) ; v1(200.948,104.735) 200.855,104.642 200.855,101.431 201.129,101.157 201.129,99.954 201.914,99.169 210.333,99.169 v1(214.334,95.168)
vih.30a=: DC10.B27 R37.1 U35.8 U36.8 U37.7 | length 121.6
  Top Layer w0.4: DC10.B27@198.95,7.35 200.212,8.612 200.212,11.062 202.362,13.213 202.362,14.057 204.541,16.235 204.541,60.76 203.884,61.417 203.884,65.5 ; v1(199.196,111.043) 199.78,111.627 199.78,112.85 206.446,112.85 U37.7@206.496,112.9 ; v1(199.704,66.262) 202.624,66.262 203.387,65.5 203.884,65.5 ; v1(199.704,70.534) 200.525,71.355 U36.8@200.525,71.85 ; R37.1@204.525,65.5 203.884,65.5
  Bottom Layer w0.4: v1(199.196,111.043) 199.196,107.332 198.886,107.023 198.886,98.545 199.704,97.728 v1(199.704,70.534) v1(199.704,66.262)
vih.31a=: DC10.C27 R39.1 U37.8 U39.7 U40.7 | length 177.1
  Top Layer w0.4: U39.7@189.85,91.4 v1(192.439,91.4) ; U40.7@189.85,133.4 189.913,133.463 195.767,133.463 198.225,131.005 198.225,127.2 198.025,127 197.081,127 v1(196.707,126.625) ; v1(198.586,54.502) 198.586,12.024 198.604,12.006 198.604,10.196 DC10.C27@198.95,9.85 ; U37.8@217.171,112.85 217.941,112.85 v1(217.941,111.779)
  Bottom Layer w0.4: v1(198.586,54.502) 198.586,75.47 192.439,81.617 v1(192.439,91.4) 196.707,95.667 v1(196.707,126.625) 196.707,127.883 198.773,129.949 200.418,129.949 207.818,122.549 216.626,122.549 217.941,121.234 v1(217.941,111.779)
vih.32a=: DC10.A28 R40.1 U39.8 U40.8 U41.7 | length 150.1
  Top Layer w0.4: v1(199.145,128.772) 200.525,130.152 U40.8@200.525,133.35 ; U39.8@200.525,91.35 206.446,91.35 U41.7@206.496,91.4 206.496,89.743 205.025,88.272 R40.1@205.025,85.5 ; DC10.A28@201.45,4.85 202.777,6.177 202.777,12.465 205.368,15.056 205.368,62.122 204.885,62.605 204.885,63.76 205.297,64.172 207.273,64.172 207.527,64.426 v1(207.527,66.135) ; v1(203.184,86.405) 204.088,85.5 R40.1@205.025,85.5 ; v1(205.419,82.239) 205.025,82.633 R40.1@205.025,85.5
  Bottom Layer w0.4: v1(199.145,128.772) 200.669,127.248 200.669,106.19 200.194,105.715 200.194,100.834 200.391,100.638 200.391,99.145 203.184,96.352 v1(203.184,86.405) ; v1(205.419,82.239) 205.419,68.244 v1(207.527,66.135)
"vihod\"b\"": C53.1 DC10.C28 U17.1 U17.14 | length 185.1
  Top Layer w0.4: U17.1@86.425,28 88.939,28 89.708,27.231 94.624,27.231 95.393,28 U17.14@97.1,28 98.266,28 100.005,26.261 100.005,20.291 ; C53.1@86.925,15.75 87.588,15.75 88.096,15.242 88.096,13.024 89.152,11.968 94.153,11.968 96.046,13.862 97.202,13.862 97.219,13.879 99.395,13.879 99.412,13.862 99.718,13.862 ; 99.959,20.291 99.959,19.35 99.755,19.146 99.755,8.35 101.203,6.903 v1(102.219,6.903)
  Bottom Layer w0.4: v1(102.219,6.903) 102.499,6.903 102.958,6.443 103.832,6.443 104.771,5.504 115.929,5.504 116.1,5.675 130.425,5.675 135.446,0.654 208.975,0.654 212.607,4.286 212.607,10.484 212.074,11.017 202.617,11.017 DC10.C28@201.45,9.85
pads on no net: DC9.A DC9.A6 DC9.A7 DC9.A8 DC9.A9 DC9.A10 DC9.A11 DC9.A12 DC9.A17 DC9.A18 DC9.A19 DC9.A20 DC9.A21 DC9.A22 DC9.A26 DC9.A27 DC9.A28 DC9.A29 DC9.A30 DC9.B DC9.B6 DC9.B7 DC9.B8 DC9.B9 DC9.B10 DC9.B11 DC9.B12 DC9.B17 DC9.B18 DC9.B19 DC9.B20 DC9.B21 DC9.B22 DC9.B26 DC9.B27 DC9.B28 DC9.B29 DC9.B30 DC9.C6 DC9.C7 DC9.C8 DC9.C9 DC9.C10 DC9.C11 DC9.C12 DC9.C17 DC9.C18 DC9.C19 DC9.C20 DC9.C21 DC9.C22 DC9.C25 DC9.C26 DC9.C27 DC9.C28 DC9.C29 DC9.C30 DC10.A DC10.A5 DC10.A29 DC10.A30 DC10.B DC10.B5 DC10.B7 DC10.B8 DC10.B9 DC10.B10 DC10.B11 DC10.B12 DC10.B13 DC10.B14 DC10.B15 DC10.B16 DC10.B17 DC10.B18 DC10.B19 DC10.B20 DC10.B21 DC10.B22 DC10.B28 DC10.B29 DC10.B30 DC10.C5 DC10.C6 DC10.C29 DC10.C30

## Polygon pours and split planes (outlines as drawn)
obs.prov on Top Layer "Top Layer-No Net2" (solid, remove dead copper, pour order 12): 0.18,-0.354 0.18,26.646 cw(c0.187,26.646) 0.187,26.653 6.18,26.653 6.18,156.646 cw(c6.187,156.646) 6.187,156.653 224.187,156.653 cw(c224.187,156.646) 224.194,156.646 224.194,26.653 230.187,26.653 cw(c230.187,26.646) 230.194,26.646 230.194,-0.354 cw(c230.187,-0.354) 230.187,-0.361 0.187,-0.361 cw(c0.187,-0.354)
obs.prov on Bottom Layer "Top Layer-No Net1" (solid, remove dead copper, pour order 9): 0.18,-0.354 0.18,26.646 cw(c0.187,26.646) 0.187,26.653 6.18,26.653 6.18,156.646 cw(c6.187,156.646) 6.187,156.653 224.187,156.653 cw(c224.187,156.646) 224.194,156.646 224.194,26.653 230.187,26.653 cw(c230.187,26.646) 230.194,26.646 230.194,-0.354 cw(c230.187,-0.354) 230.187,-0.361 0.187,-0.361 cw(c0.187,-0.354)

## Keep-outs
Keep-Out Layer:
  lines w0.254: 7.3,-0.3 220.575,-0.3 ; 7.3,3.675 7.3,132.925 7.3,150.225 223.05,150.225 223.05,2.175

## Other copper
Top Layer:
  rectangle net obs.prov: 223.175,-0.35 230.225,26.638
  rectangle net obs.prov: 223.175,26.625 224.2,150.375
  rectangle net obs.prov: 0.175,-0.35 7.175,26.638
  rectangle net obs.prov: 6.175,26.625 7.175,150.375
  rectangle net obs.prov: 6.175,150.35 224.2,156.65
Bottom Layer:
  rectangle net obs.prov: 223.175,-0.35 230.225,26.638
  rectangle net obs.prov: 223.175,26.638 224.2,150.425
  rectangle net obs.prov: 0.175,-0.35 7.275,26.65
  rectangle net obs.prov: 6.175,26.625 7.275,150.375
  rectangle net obs.prov: 6.175,150.35 224.2,156.65

## Silkscreen, mask and mechanical layers (free items; w line width, h text height)
Top Overlay:
  lines w0.2: 12.925,27.675 14.4,27.675 14.4,29.1 12.925,29.1 12.925,27.675 ; 13.825,20.2 13.825,21.625 15.3,21.625 15.3,20.2 13.825,20.2 ; 67.154,19.725 67.154,21.15 68.629,21.15 68.629,19.725 67.154,19.725 ; 74.325,30.321 74.325,31.675 75.8,31.675 75.8,30.321 74.325,30.321
  lines w0.254: 103.55,146.525 122.325,146.525 122.325,149.725 103.55,149.725 103.55,146.525
  text "A313-V.05" at 104.7,147.175 h2
  text "B_PR" at 73.725,32.525 h1
  text "A_PR" at 8.55,28.1 h1
  text "OC_A" at 9.15,20.675 h1
  text "OC_B" at 62.958,19.814 h1
Mechanical 1:
  drawing of 210 lines, arcs and shapes, not listed

## Text inside footprints (layer, text, board x,y; h text height)
DC9: Top Overlay "1" at 18.783,12.175 h1; Top Overlay "A" at 7.75,4.302 h1; Top Overlay "B" at 7.75,6.802 h1; Top Overlay "C" at 7.75,9.302 h1; Top Overlay "32" at 95.617,12.175 h1; Bottom Overlay "A" at 8.397,4.306 h1 r359.11; Bottom Overlay "B" at 8.416,6.803 h1 r0.05; Bottom Overlay "C" at 8.416,9.304 h1 r0.1; Bottom Overlay "1" at 19.35,11.975 h1 r1.82; Bottom Overlay "32" at 97.275,12.2 h1
DC10: Top Overlay "1" at 133.783,12.175 h1; Top Overlay "A" at 122.75,4.302 h1; Top Overlay "B" at 122.75,6.802 h1; Top Overlay "C" at 122.75,9.302 h1; Top Overlay "32" at 210.617,12.175 h1; Bottom Overlay "A" at 123.397,4.306 h1 r359.11; Bottom Overlay "B" at 123.416,6.803 h1 r0.05; Bottom Overlay "C" at 123.416,9.304 h1 r0.1; Bottom Overlay "1" at 134.35,11.975 h1 r1.82; Bottom Overlay "32" at 212.275,12.2 h1